# Altium PCB BOARD_4LAYER.PcbDoc (part 16 of 21)
Units mil, origin at the board's own origin, x right, y up, seen from the top; angles counter-clockwise.
Board outline 6692.91 x 10039.37 mil, 4 copper layers (Top Layer, Mid Layer 1, Mid Layer 2, Bottom Layer), stack 66.299 mil thick; 1532 components, 908 nets, 4105 pads, 1286 vias.
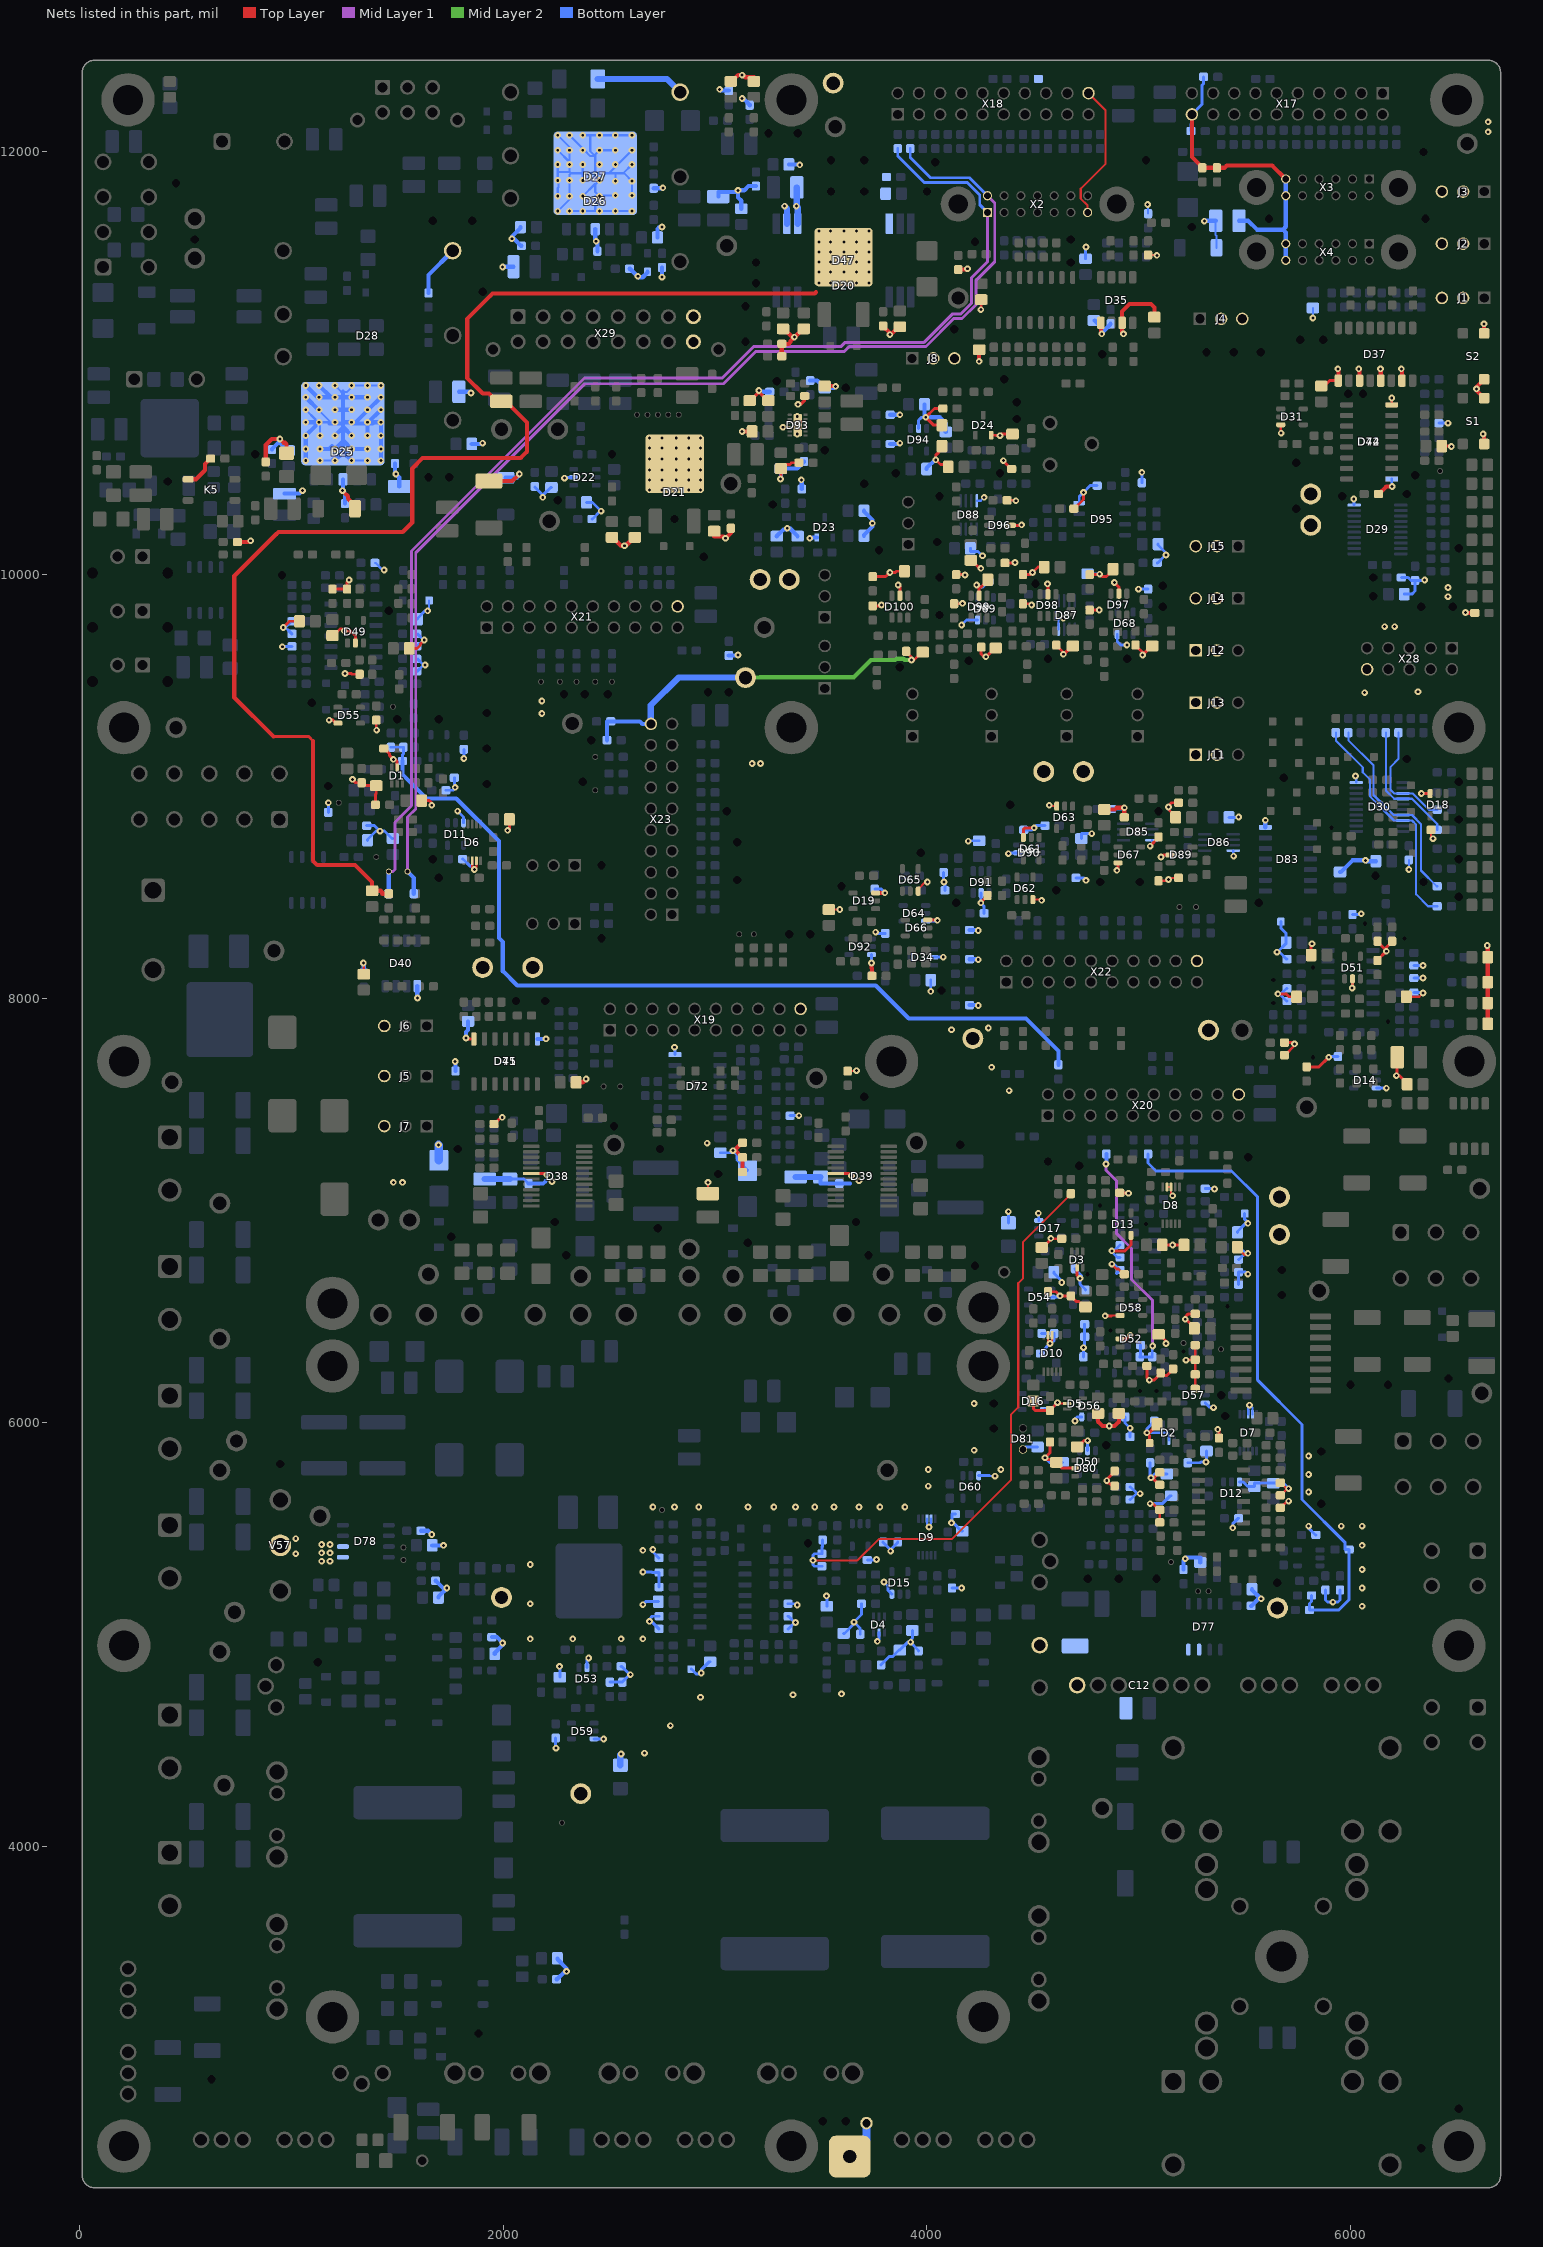
[diagram p18: the nets of this part, all layers, seen from the top]

## Via types
v1: diameter 27.56/31.5/31.5/27.56 (per signal layer), hole 13.78, Top Layer to Bottom Layer, 1270 vias
v2: diameter 59.06, hole 39.37, Top Layer to Bottom Layer, 16 vias

## Nets (pads, with @x,y where several pads share a name; then routed paths per layer and width w, separated by ;. In a path a pad name is that pad's centre, name@x,y a point inside that pad or via, vN(x,y) a via of type N, cw(c..) or ccw(c..) an arc to the next point about the centre after c; other vN are vias at no path point) (continued)
GND: C13.1 C14.1 C16.1 C17.1 C19.1 C20.1 C21.1 C22.1 C23.1 C24.1 C25.1 C26.1 C27.1 C28.1 C29.1 C30.1 C31.1 C32.1 C33.1 C34.1 C37.1 C39.1 C40.1 C41.1 C45.1 C46.1 C48.1 C49.1 C50.1 C51.1 C52.1 C53.1 C54.1 C55.1 C56.1 C57.1 C58.1 C59.1 C60.1 C61.1 C62.1 C63.1 C64.1 C65.1 C66.1 C67.1 C68.1 C69.1 C70.1 C71.1 C72.1 C73.1 C74.1 C75.1 C76.1 C77.1 C78.1 C79.1 C80.1 C81.1 C82.1 C95.1 C96.1 C97.1 C98.1 C100.1 C101.1 C102.1 C103.1 C104.1 C105.1 C106.1 C108.1 C109.1 C110.1 C111.1 C112.1 C113.1 C114.1 C115.1 C118.1 C120.1 C121.1 C122.1 C123.1 C124.1 C125.1 C126.1 C127.1 C128.1 C129.1 C130.1 C131.1 C132.1 C133.1 C134.1 C135.1 C136.1 C137.1 C138.1 C139.1 C140.1 C141.1 C142.1 C143.1 C144.1 C145.1 C146.1 C147.2 C148.2 C160.2 C162.2 C164.2 C166.2 C167.2 C168.2 C169.2 C170.2 C171.2 C172.2 C173.2 C174.2 C176.2 C177.2 C178.2 C179.2 C180.2 C181.2 C182.2 C183.2 C184.2 C185.2 C186.2 C187.2 C188.2 C189.2 C190.2 C191.2 C192.2 C193.2 C194.2 C195.2 C199.1 C201.1 C202.1 C203.1 C204.1 C205.1 C206.1 C207.1 C208.1 C209.1 C210.1 C211.1 C212.1 C213.1 C221.2 C230.2 C231.2 C245.2 C248.1 C257.1 C258.1 C259.1 C260.1 C261.1 C262.1 C264.1 C265.1 C266.1 C272.1 C273.1 C294.2 C295.2 C296.2 C297.2 C298.2 C299.2 C300.2 C309.2 C310.2 C311.1 C312.1 C313.1 C314.1 C315.1 C319.1 C320.1 C321.1 C322.1 C323.1 C326.1 D1.2 D2.2 D3.2 D4.2 D5.2 D6.3 D6.4 D7.3 D7.4 D8.3 D8.4 D9.3 D9.4 D10.3 D10.4 D11.3 D12.3 D13.3 D14.3 D15.3 D16.3 D17.3 D18.3 D19.3 D21.4 D22.2 D23.2 D25.3 D25.6 D26.3 D26.6 D27.5 D28.5 D29.10 D30.10 D31.3 D34.2 D35.5 D35.7 D37.9 D37.11 D37.13 D37.15 D38.6 D39.6 D40.5 D41.7 D42.8 D47.2 D47.3 D49.2 D50.2 D51.2 D52.2 D53.2 D54.2 D55.3 D56.3 D57.3 D58.3 D59.3 D60.3 D61.3 D62.3 D63.3 D64.3 D65.3 D66.3 D67.3 D72.7 D74.8 D75.7 D80.2 D81.3 D83.7 D85.4 D86.4 D89.2 D90.2 D91.2 D92.3 D93.4 D93.13 H18.2 H19.1 H20.2 H21.2 H22.2 H23.2 J1.2 J1.3 J2.2 J2.3 J3.2 J3.3 J4.2 J4.3 J5.3 J6.3 J7.3 J11.1 J11.2 J12.1 J12.2 J13.1 J13.2 J14.2 J14.3 J15.2 J15.3 R5.2 R7.2 R54.1 R57.2 R58.2 R59.2 R60.1 R61.1 R64.2 R65.2 R66.2 R67.1 R77.2 R78.1 R80.2 R81.2 R82.2 R84.2 R85.2 R86.2 R87.2 R88.2 R89.2 R90.1 R93.2 R94.2 R95.2 R96.1 R98.1 R106.1 R140.1 R141.1 R152.1 R153.1 R154.1 R267.1 R320.1 R321.1 R326.1 R333.1 R334.1 R339.1 R344.1 R346.1 R355.1 R356.1 R361.1 R368.1 R369.1 R374.1 R378.1 R390.1 R395.1 R402.1 R407.1 R520.1 R523.1 R530.1 R531.1 R533.1 R536.1 R537.1 R538.1 R539.1 R544.1 R561.1 R562.1 R568.1 R572.1 R573.1 R580.2 R581.2 R582.2 R586.1 R587.1 R588.1 R589.1 R605.2 R606.2 R655.1 R662.1 R663.1 R715.1 R716.1 R717.1 R718.1 R719.1 R720.1 R724.1 R725.2 R729.1 S1.3 S1.4 S2.3 S2.4 TP44.1 TP45.1 TP46.1 TP47.1 TP48.1 TP49.1 TP50.1 TP51.1 TP52.1 TP53.1 TP54.1 TP55.1 TP56.1 TP57.1 TP58.1 V7.1 V10.1 V14.1 V17.1 V21.1 V24.2 V31.1 V35.2 V39.2 V41.2 X19.20 X20.20 X21.20 X22.20 X28.10 X29.8 X29.16 | length 32382.7
  Top Layer w5.91: v1(3320.87,10696.85) D93.4@3352.36,10696.85
  Top Layer w10: D6.3@1854.33,8651.57 1854.33,8620.08 v1(1864.17,8610.24) 1874.02,8620.08 D6.4@1874.02,8651.57 ; v1@1990.16,7440.94 v1(1996.06,7440.94) ; v1(2690.94,10401.57) 2744.09,10454.72 v1(2750,10448.82) 2805.12,10503.94 D21.4@2809.06,10503.94 ; v1(2690.94,10448.82) v1(2690.94,10496.06) v1(2690.94,10547.24) 2715.63,10547.24 2725.32,10537.56 2725.32,10537.02 2736.74,10525.59 D21.4@2750,10525.59 ; v1(2690.94,10598.43) D21.4@2750,10539.37 ; v1(2690.94,10645.67) 2744.09,10592.52 v1(2750,10598.43) D21.4@2797.24,10598.43 ; v1(2750,10401.57) D21.4@2809.06,10401.57 ; v1(2750,10496.06) D21.4@2750,10525.59 ; v1(2750,10547.24) D21.4@2750,10539.37 ; v1(2750,10645.67) D21.4@2797.24,10598.43 ; v1(2875.98,10448.82) v1(2816.93,10448.82) ; v1(2875.98,10496.06) D21.4@2875.98,10543.31 ; v1(2875.98,10547.24) D21.4@2875.98,10543.31 ; v1(2875.98,10645.67) v1(2816.93,10645.67) 2816.93,10606.3 D21.4@2809.06,10598.43 ; v1(2931.1,10401.57) v1(2875.98,10401.57) v1(2816.93,10401.57) D21.4@2809.06,10401.57 ; v1(2931.1,10448.82) v1(2931.1,10496.06) v1(2931.1,10547.24) D21.4@2879.92,10547.24 ; v1(2931.1,10598.43) D21.4@2879.92,10547.24 ; v1(2931.1,10645.67) 2879.92,10594.49 v1(2875.98,10598.43) v1(2816.93,10598.43) D21.4@2809.06,10598.43 ; R544.1@2966.54,7080.71 v1(2966.54,7133.86) ; v1(3387.8,10665.35) D93.13@3387.8,10704.72 ; v1(3387.8,10748.03) v1(3387.8,10708.66) D93.13@3387.8,10704.72 ; D93.13@3389.76,10706.69 D93.13@3387.8,10704.72 ; C135.1@3537.4,8421.26 v1(3588.58,8421.26) ; C221.2@3625.98,7659.45 3665.35,7659.45 v1(3667.32,7661.42) ; D65.3@3958.66,8507.87 3958.66,8517.72 3992.13,8551.18 v1(4001.97,8551.18) ; v1(4253.94,8452.76) v1@4253.94,8454.72 ; D62.3@4500,8468.5 4537.4,8468.5 v1(4541.34,8464.57) ; D10.4@4570.87,6413.39 4570.87,6382.01 4578.86,6374.02 v1(4580.71,6374.02) 4582.56,6374.02 4590.55,6382.01 D10.3@4590.55,6413.39 ; v1(4576.77,8913.39) 4580.71,8909.45 D63.3@4612.2,8909.45 ; v1@4620.08,6090.55 D5.2@4661.42,6090.55 ; 4871.06,6503.94 4873.03,6505.91 D58.3@4911.42,6505.91 ; C61.1@4929.13,6700.79 C61.1@4931.1,6700.79 ; R718.1@5092.52,8557.09 5133.86,8557.09 v1(5139.76,8562.99) 5147.64,8570.87 R715.1@5187.01,8570.87 ; D8.4@5131.89,7112.2 D8.3@5151.57,7112.2 5151.57,7078.74 v1(5159.45,7070.87) ; D74.8@6192.91,10802.95 v1(6192.91,10834.65) ; 6322.83,8009.84 v1(6340.55,8027.56) ; C75.1@6377.95,8797.24 6377.95,8765.75 v1(6387.8,8755.91) ; D21.4@2750,10525.59 D21.4@2809.06,10525.59 ; D21.4@2750,10525.59 D21.4@2750,10539.37 ; D21.4@2797.24,10598.43 D21.4@2809.06,10598.43 ; D21.4@2809.06,10401.57 2809.06,10448.82 v1(2816.93,10448.82) ; D21.4@2809.06,10503.94 v1(2816.93,10496.06) v1(2816.93,10448.82) ; D21.4@2809.06,10503.94 D21.4@2809.06,10525.59 ; D21.4@2809.06,10525.59 2816.93,10533.46 v1(2816.93,10547.24) 2816.93,10571.93 2809.06,10579.8 D21.4@2809.06,10598.43 ; D21.4@2809.06,10525.59 2817.77,10525.59 2835.49,10543.31 D21.4@2875.98,10543.31 ; D21.4@2875.98,10543.31 D21.4@2879.92,10547.24
  Top Layer w13.78: v1(962.6,9751.97) 992.13,9781.5 C170.2@1039.37,9781.5 ; v1(1179.13,9314.96) 1182.57,9318.4 1193.41,9318.4 1210.63,9301.18 D55.3@1220.47,9301.18 ; C113.1@1194.88,9714.57 1198.82,9714.57 1229.81,9745.56 1240.66,9745.56 v1(1250,9736.22) 1278.62,9736.22 1303.15,9711.69 D49.2@1303.15,9679.13 ; C294.2@1194.88,9933.07 R520.1@1263.78,9933.07 1263.78,9966.54 v1(1273.62,9976.38) ; v1(1253.94,9535.43) 1283.46,9535.43 1287.4,9531.5 R326.1@1322.83,9531.5 ; v1(1289.37,9035.43) 1305.12,9019.68 R140.1@1332.68,9019.68 1346.46,9005.91 C100.1@1401.57,9005.91 1401.57,8969.41 1397.64,8965.47 C95.1@1397.64,8915.35 ; v1(1340.55,8169.29) 1342.52,8167.32 C167.2@1342.52,8116.14 ; C26.1@1401.57,9314.96 1401.57,9269.68 v1(1403.54,9267.72) ; R54.1@1437.01,9181.1 1438.98,9181.1 1464.83,9155.25 1464.83,9147.38 v1(1482.28,9129.92) 1491.22,9129.92 1500,9121.14 D1.2@1500,9090.55 ; C169.2@1557.09,9653.54 1594.28,9653.54 1610.5,9669.76 1610.5,9675.46 v1(1627.95,9692.91) ; C110.1@1616.14,8935.04 1652.64,8935.04 1663.39,8924.29 v1(1663.39,8913.39) ; v1(1824.8,7814.96) 1828.74,7811.02 D75.7@1861.81,7811.02 ; C21.1@1956.69,7409.45 1958.66,7409.45 v1@1990.16,7440.94 ; v1(2021.65,8795.28) 2029.53,8803.15 C109.1@2029.53,8846.46 ; D38.6@2132.87,7176.18 2199.8,7176.18 v1(2206.69,7169.29) ; C146.1@3163.39,10822.83 3167.32,10822.83 3206.69,10862.2 v1@3206.69,10864.17 ; v1(3206.69,10870.08) v1@3206.69,10864.17 ; C195.2@3251.97,10822.83 3248.03,10822.83 v1@3206.69,10864.17 ; v1(3309.06,10452.76) 3311.02,10454.72 C147.2@3311.02,10501.97 3311.02,10521.65 3353.35,10521.65 3361.22,10529.53 R725.2@3395.67,10529.53 ; v1(3391.73,10805.12) 3404.16,10805.12 3423.23,10824.19 R724.1@3423.23,10844.49 ; D39.6@3569.88,7176.18 3632.87,7176.18 v1(3643.7,7165.35) ; D66.3@4003.94,8372.05 4047.24,8372.05 v1(4049.21,8370.08) ; v1@4253.94,8454.72 4285.43,8486.22 C77.1@4285.43,8488.19 ; D61.3@4454.72,8761.81 4454.72,8797.92 4463.89,8807.09 v1(4505.91,8807.09) ; C138.1@4501.97,6102.36 4501.97,6065.87 4510.75,6057.09 R98.1@4580.71,6057.09 4580.71,6059.06 4612.2,6090.55 4620.08,6090.55 v1(4616.14,6094.49) ; C125.1@4541.34,6826.77 4545.28,6826.77 4584.65,6866.14 v1(4584.65,6870.08) 4586.61,6868.11 C97.1@4635.83,6868.11 ; R78.1@4570.87,6618.11 4608.27,6618.11 v1(4627.95,6598.43) R152.1@4679.13,6598.43 4679.13,6596.46 4704.22,6571.37 4718,6571.37 4744.09,6545.28 C102.1@4748.03,6545.28 ; R154.1@4580.71,5909.45 4580.71,5858.27 v1(4557.09,5834.65) 4565.92,5825.81 4610.24,5825.81 C264.1@4610.24,5812.99 4637.8,5785.43 D80.2@4698.82,5785.43 ; C265.1@4708.66,5885.83 4712.6,5885.83 4743.59,5916.82 4756.41,5916.82 v1(4757.87,5915.35) ; D3.2@4708.66,6732.28 4708.66,6694.88 v1(4722.44,6681.1) ; v1(4840.55,6503.94) 4871.06,6503.94 ; v1(4872.05,6748.03) 4894.2,6725.88 4904.04,6725.88 C61.1@4929.13,6700.79 ; v1(4872.05,6811.02) 4934.84,6811.02 4962.6,6838.79 D13.3@4962.6,6883.86 ; R378.1@4885.83,5700.79 4874.02,5700.79 4859.74,5715.07 ; C211.1@4885.83,5771.65 4885.83,5769.69 4848.43,5732.28 v1(4848.43,5726.38) ; v1(4895.67,8606.3) 4901.57,8612.2 D67.3@4901.57,8641.73 ; C54.1@4909.45,7084.65 4948.82,7084.65 v1(4950.79,7082.68) ; D52.2@4911.42,6395.67 4943.98,6395.67 4958.66,6410.35 v1(4958.66,6413.39) ; R361.1@5037.4,6267.72 5037.4,6212.6 v1(5049.21,6200.79) 5070.87,6200.79 R531.1@5102.36,6232.28 ; V10.1@5050.2,5903.54 5050.2,5939.96 v1(5037.4,5952.76) 5049.21,5952.76 5084.65,5988.19 C312.1@5084.65,5992.13 ; v1(5053.15,5618.11) 5066.93,5618.11 5096.46,5588.58 R395.1@5098.43,5588.58 C34.1@5098.43,5529.53 ; v1(5053.15,8720.47) 5053.15,8722.44 5092.52,8761.81 C212.1@5092.52,8763.78 ; v1(5057.09,5740.16) v1@5062.99,5740.16 ; C126.1@5092.52,6417.32 5096.46,6417.32 5127.95,6385.83 v1(5127.95,6374.02) ; C30.1@5098.43,5706.69 5096.46,5706.69 v1@5062.99,5740.16 ; R334.1@5098.43,5765.75 5096.46,5765.75 5070.87,5740.16 v1@5062.99,5740.16 ; R531.1@5102.36,6234.25 R531.1@5102.36,6232.28 ; v1(5104.33,8669.29) 5114.17,8679.13 D89.2@5149.21,8679.13 ; C187.2@5110.24,6838.58 v1(5159.45,6838.58) C124.1@5212.6,6838.58 ; C298.2@5161.42,6253.94 5161.42,6251.97 5132.95,6223.5 5102.36,6223.5 R531.1@5102.36,6232.28 ; C140.1@5173.23,8856.3 5173.23,8860.24 5139.76,8893.7 v1(5139.76,8905.51) 5139.76,8910.51 5154.45,8925.2 C76.1@5187.01,8925.2 ; v1(5222.44,6295.28) 5224.41,6297.24 C297.2@5265.75,6297.24 ; C188.2@5261.81,6444.88 5261.81,6448.82 5222.44,6488.19 v1(5218.5,6488.19) 5218.5,6499.09 5233.19,6513.78 C60.1@5265.75,6513.78 ; R87.2@5265.75,6159.45 R88.2@5265.75,6228.35 C297.2@5265.75,6297.24 ; R89.2@5265.75,6366.14 C297.2@5265.75,6297.24 ; v1(5372.05,5968.5) 5377.95,5962.6 R333.1@5377.95,5927.17 ; C186.2@5464.57,6828.74 5464.57,6824.8 5495.56,6793.81 5508.37,6793.81 v1(5513.78,6799.21) ; v1(5655.51,8023.62) 5694.42,8023.62 5708.2,8009.84 C184.2@5744.09,8009.84 ; R64.2@5667.32,5598.43 5669.29,5598.43 5700.79,5629.92 v1(5706.69,5629.92) ; C29.1@5667.32,5657.48 5669.29,5657.48 v1@5700.79,5688.98 ; R65.2@5667.32,5716.54 5669.29,5716.54 5696.85,5688.98 v1@5700.79,5688.98 ; D31.3@5669.29,10708.66 5669.29,10671.26 v1(5671.26,10669.29) ; R77.2@5687.01,7734.25 5688.98,7734.25 5734.25,7779.53 v1(5734.25,7787.4) 5734.25,7795.28 5732.28,7793.31 C245.2@5687.01,7793.31 ; v1(5706.69,5688.98) v1@5700.79,5688.98 ; C230.2@5791.34,7679.13 5850.39,7679.13 v1(5895.67,7724.41) ; C127.1@5812.99,8206.69 5812.99,8255.91 v1(5816.93,8259.84) ; C105.1@5860.24,10891.73 5874.98,10891.73 5900.57,10917.32 D37.9@5941.14,10917.32 ; v1(6005.91,8051.18) 6007.87,8053.15 D51.2@6007.87,8094.49 ; R662.1@6125.98,8181.1 6125.98,8183.07 v1(6167.32,8224.41) v1@6167.32,8228.35 ; R530.1@6125.98,8271.65 6125.98,8269.68 v1@6167.32,8228.35 ; C296.2@6194.88,8271.65 6194.88,8269.68 6167.32,8242.13 v1@6167.32,8228.35 ; R655.1@6218.5,7724.41 6218.5,7641.73 v1(6214.57,7637.8) 6228.35,7637.8 6265.75,7600.39 C185.2@6265.75,7596.46 ; C183.2@6261.81,8009.84 6322.83,8009.84 ; v1(6332.68,8968.5) D18.3@6374.02,8968.5 ; C104.1@6429.13,10608.27 6472.44,10608.27 v1(6474.41,10606.3) ; v1(4848.43,5726.38) 4859.74,5715.07 ; v1(4848.43,5726.38) 4848.43,5716.54 4849.89,5715.07 4859.74,5715.07
  Top Layer w19.68: C74.1@746.06,10155.51 803.15,10155.51 v1(809.06,10161.42) ; C52.1@879.92,10533.46 879.92,10613.14 908.51,10641.73 v1(946.85,10641.73) 964.31,10624.28 971.27,10624.28 978.35,10617.2 R568.1@978.35,10574.8 ; v1(1242.13,10397.64) 1259.58,10380.18 1259.83,10380.18 1268.22,10371.8 1268.22,10359.74 1301.18,10326.77 V41.2@1301.18,10312.99 ; R729.1@1933.07,10442.91 2043.31,10442.91 v1(2076.77,10476.38) ; C108.1@2344.49,7606.3 2375.98,7606.3 v1(2391.73,7622.05) ; C123.1@2513.78,10177.17 2517.72,10177.17 2557.09,10137.8 v1(2572.83,10137.8) 2578.74,10137.8 2618.11,10177.17 C181.2@2622.05,10177.17 ; C122.1@2996.06,10206.69 2996.06,10181.1 3041.34,10181.1 v1(3049.21,10173.23) 3050.18,10173.23 3074.8,10197.85 C51.1@3074.8,10220.47 ; v1(3084.65,7283.46) v1@3090.55,7283.46 ; v1(3127.95,10677.17) C326.1@3175.2,10677.17 ; R580.2@3129.92,7183.07 R582.2@3129.92,7251.97 3127.95,7251.97 3096.46,7283.46 v1@3090.55,7283.46 ; R581.2@3129.92,7320.87 3127.95,7320.87 v1@3090.55,7283.46 ; H22.2@3183.07,12328.74 3183.07,12348.47 3142.64,12348.47 3132.84,12358.27 v1(3127.95,12358.27) 3126.48,12359.74 3109.74,12359.74 H18.2@3094.75,12344.75 ; C144.1@3517.72,10891.73 3566.93,10891.73 v1(3568.9,10889.76) ; v1(3738.19,8169.29) 3738.19,8144.61 3740.16,8142.64 C79.1@3740.16,8108.27 ; D19.3@3757.87,8500 v1(3801.18,8500) ; v1(4246.06,11007.87) C160.2@4246.06,11062.99 ; C266.1@4807.09,6043.31 4807.09,6004.92 4827.76,5984.25 v1(4860.24,5984.25) 4884.74,5984.25 4886.81,5986.33 4886.92,5986.33 4905.51,6004.92 C137.1@4905.51,6043.31 ; D35.5@4820.67,11189.76 4820.67,11141.93 v1(4824.8,11137.8) ; C192.2@4836.61,8893.7 4887.8,8893.7 4895.67,8901.57 v1(4931.1,8901.57) C82.1@4931.1,8856.3 ; v1(4927.17,11137.8) 4920.67,11144.29 D35.7@4920.67,11189.76 4920.67,11242.49 4956.26,11278.08 5056.93,11278.08 5072.83,11262.17 C106.1@5072.83,11216.54 ; v1(5938.98,10972.44) 5941.14,10970.28 D37.9@5941.14,10917.32 ; v1(6037.4,10972.44) 6041.14,10968.7 D37.11@6041.14,10917.32 ; C14.1@6129.92,10381.89 6131.89,10381.89 6167.32,10417.32 v1(6194.88,10417.32) ; v1(6139.76,10972.44) 6141.14,10971.06 D37.13@6141.14,10917.32 ; v1(6238.19,10972.44) 6241.14,10969.49 D37.15@6241.14,10917.32 ; v1(6541.34,9822.83) 6543.31,9820.87 C199.1@6584.65,9820.87 ; v1(6624.02,10665.35) 6628.74,10660.63 S1.3@6628.74,10618.11 ; v1(6627.95,11185.04) 6628.74,11184.25 S2.4@6628.74,11139.76 ; S1.4@6628.74,10834.65 6592.52,10870.87 v1(6592.52,10877.95) 6592.52,10887.01 S2.3@6628.74,10923.23 ; v1(6643.7,8251.97) 6645.67,8250 H23.2@6645.67,8196.85 H21.2@6645.67,8078.74 H19.1@6645.67,7980.31 H20.2@6645.67,7881.89 ; H18.2@3094.75,12344.75 3090.81,12344.75 H18.2@3074.8,12328.74 3078.74,12328.74 H18.2@3094.75,12344.75
  Bottom Layer w10: v1@972.44,9751.97 C24.1@984.97,9739.44 ; v1(1068.9,10779.53) 1114.57,10733.86 D25.6@1114.57,10714.17 ; D25.6@1131.89,10775.59 1181.5,10725.98 1181.5,10714.17 1175.2,10720.47 v1(1131.89,10720.47) 1131.89,10718.11 1135.83,10714.17 v1(1135.83,10657.48) ; v1(1135.83,10539.37) 1186.48,10539.37 1196.59,10549.47 v1(1206.69,10539.37) ; v1(1206.69,10893.7) 1236.22,10864.17 1244.09,10864.17 1263.78,10864.17 D25.6@1293.31,10893.7 ; v1(1285.43,10539.37) v1(1360.24,10539.37) ; v1(1285.43,10893.7) D25.6@1293.31,10893.7 ; R320.1@1395.67,10057.09 1397.64,10057.09 1431.1,10023.62 v1(1438.98,10023.62) ; v1(1423.23,10893.7) v1(1360.24,10893.7) D25.6@1293.31,10893.7 ; v1@1624.02,9574.8 v1(1631.89,9574.8) ; v1@1624.02,9692.91 v1(1627.95,9692.91) ; v1@1631.89,9830.71 v1(1643.7,9830.71) 1650.59,9837.6 V7.1@1650.59,9879.92 ; C39.1@2149.61,10415.35 C39.1@2149.61,10417.32 ; v1@2248.03,4466.54 v1(2250,4464.57) ; v1(2257.87,11716.54) 2320.87,11779.53 v1(2312.99,11787.4) v1(2312.99,11862.2) 2312.99,11888.98 D26.6@2319.29,11895.28 ; v1(2257.87,11787.4) 2257.87,11826.77 2261.81,11830.71 2261.81,11858.27 v1(2257.87,11862.2) D26.6@2257.87,11901.57 ; v1(2257.87,11937.01) D26.6@2257.87,11901.57 ; v1(2257.87,12003.94) D26.6@2312.99,11948.82 ; v1(2257.87,12074.8) 2320.87,12011.81 v1(2312.99,12003.94) D26.6@2312.99,11948.82 ; v1(2312.99,11716.54) v1(2375.98,11716.54) D26.6@2435.04,11716.54 ; v1(2312.99,12074.8) D26.6@2383.86,12003.94 ; v1(2375.98,11787.4) 2433.33,11844.75 D26.6@2435.04,11844.75 ; v1(2375.98,11862.2) D26.6@2375.98,11895.28 ; v1(2375.98,11937.01) D26.6@2375.98,11895.28 ; v1(2375.98,12003.94) D26.6@2383.86,12003.94 ; v1(2375.98,12074.8) D26.6@2411.42,12074.8 ; v1(2454.72,11937.01) D26.6@2435.04,11937.01 ; v1(2529.53,11791.34) 2454.72,11791.34 v1(2454.72,11787.4) ; v1(2529.53,11858.27) D26.6@2529.53,11895.28 ; v1(2529.53,11937.01) D26.6@2529.53,11925.2 ; v1(2529.53,12003.94) v1(2454.72,12003.94) 2435.04,11984.25 D26.6@2435.04,11976.38 ; v1(2608.27,11716.54) v1(2529.53,11716.54) v1(2454.72,11716.54) D26.6@2435.04,11716.54 ; v1(2608.27,11791.34) v1(2608.27,11858.27) 2571.26,11895.28 D26.6@2566.54,11895.28 ; v1(2608.27,11937.01) D26.6@2566.54,11895.28 ; v1(2608.27,12003.94) D26.6@2529.53,11925.2 ; v1(2608.27,12074.8) v1(2529.53,12074.8) v1(2454.72,12074.8) D26.6@2411.42,12074.8 ; V39.2@3153.54,7188.98 V39.2@3153.54,7192.91 ; D9.3@4000,5547.24 4000,5515.87 v1@4005.81,5510.06 ; v1(4009.84,5507.87) 4007.99,5507.87 v1@4005.81,5510.06 ; D9.4@4019.68,5547.24 4019.68,5523.94 v1@4005.81,5510.06 ; 4294.21,5750 4296.18,5748.03 v1(4320.87,5748.03) ; C164.2@4787.4,11200.79 C164.2@4791.34,11200.79 ; v1(5037.4,5952.76) 5134.92,5952.76 5141.73,5945.94 D2.2@5141.73,5915.35 ; v1(5053.15,8720.47) 5061.02,8728.35 D85.4@5061.02,8749.02 ; D86.4@5444.88,8699.8 5444.88,8675.2 v1(5446.85,8673.23) ; D7.3@5515.75,6039.37 5515.75,6076.77 v1(5521.65,6082.68) 5523.5,6082.68 5535.43,6070.75 D7.4@5535.43,6039.37 ; v1(6021.65,9051.18) 6025.59,9047.24 D30.10@6025.59,9020.67 ; v1(6273.62,8610.24) R106.1@6273.62,8655.51 ; D26.6@2257.87,11901.57 D26.6@2312.99,11901.57 ; D26.6@2312.99,11901.57 D26.6@2319.29,11895.28 ; D26.6@2312.99,11901.57 v1(2312.99,11937.01) D26.6@2312.99,11948.82 ; D26.6@2319.29,11895.28 D26.6@2375.98,11895.28 ; D26.6@2375.98,11895.28 D26.6@2435.04,11895.28 ; D26.6@2383.86,12003.94 2411.42,11976.38 D26.6@2435.04,11976.38 ; D26.6@2411.42,12074.8 2411.42,12000 D26.6@2435.04,11976.38 ; D26.6@2435.04,11716.54 2435.04,11787.4 v1(2454.72,11787.4) ; D26.6@2435.04,11844.75 2435.04,11807.09 v1(2454.72,11787.4) ; D26.6@2435.04,11844.75 2437.27,11844.75 v1(2454.72,11862.2) 2435.04,11881.89 D26.6@2435.04,11895.28 ; D26.6@2435.04,11895.28 D26.6@2499.61,11895.28 ; D26.6@2435.04,11895.28 D26.6@2435.04,11937.01 ; D26.6@2435.04,11937.01 D26.6@2435.04,11976.38 ; D26.6@2499.61,11895.28 D26.6@2529.53,11925.2 ; D26.6@2499.61,11895.28 D26.6@2529.53,11895.28 ; D26.6@2529.53,11895.28 D26.6@2566.54,11895.28
  Bottom Layer w13.78: v1(958.66,9661.42) 960.63,9663.39 R57.2@1003.94,9663.39 ; v1(962.6,9751.97) 972.44,9751.97 1001.97,9781.5 R58.2@1003.94,9781.5 ; R60.1@1175.2,8879.92 v1(1175.2,8925.2) ; C27.1@1356.3,8816.93 1393.7,8816.93 v1(1419.29,8791.34) ; C171.2@1360.24,8748.03 1360.24,8751.97 1399.61,8791.34 v1(1419.29,8791.34) ; C321.1@1480.32,8755.91 1476.38,8755.91 1440.94,8791.34 v1(1419.29,8791.34) ; C33.1@1592.52,9545.28 1594.49,9545.28 1624.02,9574.8 1594.49,9604.33 R390.1@1592.52,9604.33 ; C25.1@1592.52,9663.39 1594.49,9663.39 1624.02,9692.91 1594.49,9722.44 R321.1@1592.52,9722.44 ; C311.1@1596.46,9791.34 1596.46,9795.28 v1@1631.89,9830.71 ; R59.2@1730.32,8984.25 1762.87,8984.25 1773.62,8995 v1(1773.62,8998.03) 1769.68,9001.97 C202.1@1769.68,9043.31 ; v1(1785.43,8885.83) 1812.99,8858.27 D11.3@1812.99,8830.71 ; C23.1@1809.06,8659.45 1811.02,8659.45 1842.78,8627.69 1846.72,8627.69 v1(1864.17,8610.24) ; v1(1814.96,9133.86) C203.1@1814.96,9177.17 ; C320.1@2031.5,7149.61 2098.43,7149.61 C20.1@2120.08,7127.95 ; C39.1@2149.61,10415.35 2187.01,10377.95 v1@2187.01,10375.98 ; v1(2187.01,10366.14) v1@2187.01,10375.98 ; C176.2@2228.35,10413.39 2224.41,10413.39 v1@2187.01,10375.98 ; v1@2248.03,4466.54 C66.1@2248.03,4511.81 ; v1(2265.75,4850.39) 2267.72,4848.43 C130.1@2267.72,4799.21 ; v1(2289.37,10456.69) 2293.31,10460.63 D22.2@2332.68,10460.63 ; C177.2@2393.7,10342.52 2421.26,10342.52 v1(2462.6,10301.18) 2458.66,10301.18 2421.26,10263.78 C40.1@2419.29,10263.78 ; D53.2@2395.67,4844.49 2395.67,4881.89 v1(2403.54,4889.76) ; D59.3@2429.13,4507.87 v1(2474.41,4507.87) ; R533.1@2503.94,4775.59 C299.2@2562.99,4775.59 2562.99,4777.56 2596.46,4811.02 v1@2598.43,4811.02 ; R374.1@2557.09,4850.39 2559.06,4850.39 v1@2598.43,4811.02 ; v1(2600.39,4811.02) v1@2598.43,4811.02 ; v1(2659.45,5141.73) 2673.23,5155.51 C189.2@2732.28,5155.51 ; v1(2659.45,5295.28) 2701.69,5295.28 2703.66,5293.31 C69.1@2736.22,5293.31 C65.1@2736.22,5224.41 ; v1(2706.69,5401.57) 2706.69,5389.76 2734.25,5362.2 R407.1@2736.22,5362.2 ; R368.1@2736.22,5027.56 2734.25,5027.56 2698.82,5062.99 v1(2690.94,5062.99) 2690.94,5073.9 2703.66,5086.61 R369.1@2736.22,5086.61 ; v1(2809.06,7771.65) 2811.02,7769.69 D72.7@2811.02,7736.61 ; V21.1@2887.8,4837.6 2888.78,4837.6 2913.05,4813.32 2929.47,4813.32 v1(2935.04,4818.9) 2935.04,4834.65 2972.44,4872.05 C315.1@2976.38,4872.05 ; C166.2@3025.59,7273.62 3074.8,7273.62 v1(3084.65,7283.46) 3102.86,7265.25 3102.86,7243.59 V39.2@3153.54,7192.91 ; R94.2@3344.49,5027.56 3346.46,5027.56 v1@3375.98,5057.09 ; C64.1@3344.49,5086.61 3346.46,5086.61 v1@3375.98,5057.09 ; R93.2@3344.49,5145.67 3381.89,5145.67 v1(3387.8,5139.76) ; C22.1@3354.33,7448.82 v1(3395.67,7448.82) ; v1(3379.92,5057.09) v1@3375.98,5057.09 ; v1(3525.59,5183.07) 3527.56,5181.1 C190.2@3527.56,5133.86 ; C103.1@3606.3,5005.91 3610.24,5005.91 3655.51,5051.18 v1(3655.51,5059.06) ; R153.1@3685.04,5001.97 3685.04,5028.51 3679.02,5034.53 3679.02,5035.55 v1(3655.51,5059.06) ; C98.1@3690.94,5145.67 3690.94,5094.49 v1(3655.51,5059.06) ; C209.1@3718.5,5352.36 3759.84,5352.36 v1(3761.81,5354.33) ; v1(3738.19,8169.29) D92.3@3738.19,8208.66 ; C213.1@3753.94,8517.72 3784.53,8517.72 3801.18,8501.06 v1(3801.18,8500) ; v1(3757.87,8314.96) 3763.78,8309.06 R586.1@3803.15,8309.06 ; v1(3765.75,4968.5) 3773.62,4976.38 D4.2@3773.62,5009.84 ; R90.1@3783.46,4856.3 3783.46,4858.27 3821.37,4896.17 3837.11,4896.17 3868.11,4927.17 C133.1@3872.05,4927.17 3909.45,4964.57 v1@3917.02,4964.57 ; R95.2@3793.31,5437.01 3793.31,5435.04 v1@3828.74,5399.61 ; v1(3797.24,5248.03) 3816.09,5229.18 3816.09,5209.5 D15.3@3834.65,5190.94 ; v1(3828.74,5393.7) v1@3828.74,5399.61 ; C208.1@3862.2,5437.01 3862.2,5435.04 3828.74,5401.57 v1@3828.74,5399.61 ; C129.1@3931.1,5019.69 3931.1,4983.19 3917.02,4969.1 v1@3917.02,4964.57 ; C68.1@3960.63,4923.23 3960.63,4925.2 3923.23,4962.6 v1(3923.23,4964.57) v1@3917.02,4964.57 ; D64.3@3994.09,8366.14 4045.28,8366.14 v1(4049.21,8370.08) ; v1(4017.72,8035.43) C193.2@4017.72,8088.58 ; D34.2@4033.46,8196.85 v1(4076.77,8196.85) ; C80.1@4078.74,8596.46 4078.74,8553.15 v1(4080.71,8551.18) 4084.65,8547.24 R717.1@4084.65,8511.81 ; C63.1@4118.11,5220.47 v1(4163.39,5220.47) ; C210.1@4133.86,5568.9 4117.57,5568.9 4117.57,5538.31 4116.14,5536.88 v1(4116.14,5527.56) 4124.02,5527.56 4163.39,5488.19 C128.1@4167.32,5488.19 ; v1(4194.88,8744.09) 4196.85,8746.06 C142.1@4246.06,8746.06 ; D60.3@4244.09,5750 4294.21,5750 ; D91.2@4255.91,8499.61 4255.91,8454.72 v1(4253.94,8452.76) 4269.69,8437.01 R720.1@4269.69,8403.54 ; R605.2@4383.86,6942.91 v1(4383.86,6996.06) ; v1(4383.86,8685.04) 4387.8,8688.98 D90.2@4430.71,8688.98 ; D81.3@4452.76,5873.23 4465.35,5885.83 C139.1@4521.65,5885.83 ; R719.1@4456.69,8797.24 4496.06,8797.24 v1(4505.91,8807.09) 4515.75,8816.93 R716.1@4557.09,8816.93 ; v1(4525.59,6988.19) 4527.56,6986.22 D17.3@4527.56,6954.72 ; C72.1@4535.43,6326.77 4563.25,6354.59 4563.25,6356.56 v1(4580.71,6374.02) 4585.71,6374.02 4600.39,6388.7 R536.1@4600.39,6421.26 C300.2@4541.34,6421.26 ; D16.3@4555.12,6062.99 4584.65,6062.99 v1(4616.14,6094.49) ; v1(4557.09,5834.65) 4578.74,5812.99 C114.1@4639.76,5812.99 ; D54.2@4584.65,6592.52 4622.05,6592.52 v1(4627.95,6598.43) ; C136.1@4598.43,6710.63 4598.43,6706.69 4635.83,6669.29 v1(4635.83,6661.42) ; v1(4698.82,6007.87) 4698.82,6018.78 4707.6,6027.56 D56.3@4730.31,6027.56 ; C73.1@4698.82,6726.38 4698.82,6724.41 4730.31,6692.91 4730.31,6681.1 v1(4722.44,6681.1) 4722.44,6653.54 4748.03,6627.95 R663.1@4748.03,6625.98 ; C78.1@4702.76,8570.87 4738.19,8570.87 v1(4750,8559.06) ; C141.1@4728.35,8755.91 4728.35,8779.53 v1(4777.56,8779.53) ; C206.1@4738.19,6311.02 v1(4738.19,6354.33) 4744.09,6360.24 C207.1@4744.09,6405.51 R86.2@4744.09,6464.57 ; D50.2@4757.87,5868.11 v1(4757.87,5915.35) ; C81.1@4870.08,8895.67 4925.2,8895.67 v1(4931.1,8901.57) ; v1(4872.05,6748.03) 4881.89,6748.03 R84.2@4909.45,6720.47 ; v1(4872.05,6811.02) v1@4877.95,6811.02 ; C58.1@4911.42,6779.53 4899.01,6779.53 4877.95,6800.58 v1@4877.95,6811.02 ; R85.2@4911.42,6838.58 4886.33,6813.49 4884.36,6813.49 4881.89,6811.02 v1@4877.95,6811.02 ; C31.1@4935.04,6027.56 4935.04,5998.03 v1(4958.66,5974.41) R339.1@4958.66,5933.07 ; R523.1@4958.66,5637.8 4960.63,5637.8 4988.19,5665.35 v1@4992.13,5665.35 ; C295.2@4958.66,5696.85 4960.63,5696.85 v1@4992.13,5665.35 ; v1(5005.91,5665.35) v1@4992.13,5665.35 ; v1(5037.4,5952.76) 5037.4,5970.47 5072.83,6005.91 C96.1@5072.83,6007.87 ; v1(5053.15,5618.11) 5110.24,5618.11 5147.64,5655.51 C172.2@5151.57,5655.51 ; R141.1@5053.15,5811.02 5053.15,5744.09 v1(5057.09,5740.16) 5074.8,5757.87 C101.1@5131.89,5757.87 ; R61.1@5230.31,5811.02 5288.31,5811.02 5292.24,5814.96 v1(5316.93,5814.96) 5318.9,5816.93 C112.1@5318.9,5866.14 ; D57.3@5312.99,6092.52 5331.54,6073.97 5348.04,6073.97 5351.14,6070.87 v1(5352.36,6070.87) ; R355.1@5312.99,7104.33 5354.33,7104.33 v1(5356.3,7102.36) ; C143.1@5425.2,8856.3 5468.5,8856.3 v1(5470.47,8858.27) ; v1(5442.91,5503.94) 5442.91,5523.62 5468.5,5549.21 C28.1@5470.47,5549.21 ; C314.1@5464.57,6897.64 5464.57,6901.57 5503.94,6940.94 v1(5513.78,6940.94) 5513.78,6944.88 5499.02,6959.64 V17.1@5499.02,6986.22 ; C62.1@5470.47,6651.57 R402.1@5470.47,6710.63 5503.94,6710.63 v1(5513.78,6700.79) ; C59.1@5470.47,6769.69 5472.44,6769.69 v1@5501.97,6799.21 ; R356.1@5470.47,6828.74 5472.44,6828.74 v1@5501.97,6799.21 ; D12.3@5474.41,5720.47 5492.13,5720.47 5513.78,5698.82 C111.1@5545.28,5698.82 5545.28,5714.57 C173.2@5633.86,5714.57 5681.1,5714.57 v1(5706.69,5688.98) ; v1(5513.78,6799.21) v1@5501.97,6799.21 ; v1(5651.57,8220.47) v1@5653.54,8220.47 ; v1(5655.51,8023.62) v1@5663.39,8023.62 ; V14.1@5670.28,8364.17 5670.28,8332.68 5694.88,8308.07 C313.1@5694.88,8265.75 5694.88,8261.81 v1@5653.54,8220.47 ; R80.2@5698.82,7990.16 5696.85,7990.16 v1@5663.39,8023.62 ; C55.1@5698.82,8049.21 5696.85,8049.21 5671.26,8023.62 v1@5663.39,8023.62 ; R346.1@5698.82,8187.01 5696.85,8187.01 5663.39,8220.47 v1@5653.54,8220.47 ; v1(5801.18,5511.81) 5801.18,5501.97 5832.68,5470.47 C205.1@5834.65,5470.47 ; R66.2@5879.92,5210.63 5879.92,5163.29 5889.66,5153.54 v1(5915.35,5153.54) 5939.08,5153.54 5948.82,5163.29 C204.1@5948.82,5210.63 ; v1(5895.67,7724.41) 5899.61,7728.35 C57.1@5938.98,7728.35 ; R344.1@6007.87,8397.64 6045.28,8397.64 v1(6049.21,8401.57) ; v1(6013.78,10358.27) 6015.75,10356.3 D29.10@6015.75,10329.72 ; D14.3@6120.08,7578.74 v1(6167.32,7578.74) ; D42.8@6192.91,10452.95 6192.91,10419.29 v1(6194.88,10417.32) ; C13.1@6238.19,9988.19 6270.67,9988.19 6284.45,9974.41 R5.2@6303.15,9974.41 ; C162.2@6251.97,9909.45 6287.77,9909.45 6303.15,9924.83 R5.2@6303.15,9974.41 ; R82.2@6297.24,8029.53 6338.58,8029.53 v1(6340.55,8027.56) ; C56.1@6297.24,8098.43 v1(6340.55,8098.43) ; R81.2@6297.24,8157.48 v1(6340.55,8157.48) ; v1(6348.43,9976.38) 6346.46,9974.41 R5.2@6303.15,9974.41 ; R7.2@6415.35,10716.54 v1(6458.66,10716.54) ; R84.2@4909.45,6720.47 R84.2@4911.42,6720.47 4895.53,6704.58 4893.56,6704.58 R84.2@4909.45,6720.47 ; C24.1@984.97,9739.44 986.94,9739.44 C24.1@1003.94,9722.44 1001.97,9722.44 C24.1@984.97,9739.44
  Bottom Layer w19.68: C272.1@909.45,10592.52 909.45,10594.49 v1@946.85,10631.89 ; v1(946.85,10641.73) v1@946.85,10631.89 ; C310.2@968.5,10383.86 1039.37,10383.86 v1(1053.15,10397.64) ; R572.1@988.19,10586.61 984.25,10586.61 946.85,10624.02 v1@946.85,10631.89 ; v1(1068.9,10539.37) v1(1068.9,10594.49) v1(1068.9,10657.48) 1114.57,10703.15 D25.6@1114.57,10714.17 ; v1(1068.9,10720.47) 1108.27,10720.47 D25.6@1114.57,10714.17 ; v1(1068.9,10838.58) 1131.89,10775.59 v1(1131.89,10779.53) ; v1(1068.9,10893.7) 1127.95,10834.65 v1(1131.89,10838.58) D25.6@1187.01,10838.58 ; v1(1131.89,10720.47) 1120.87,10720.47 D25.6@1114.57,10714.17 ; v1(1131.89,10893.7) D25.6@1187.01,10838.58 ; v1(1135.83,10594.49) 1178.61,10594.49 1192.65,10608.53 v1(1206.69,10594.49) D25.6@1244.09,10631.89 ; D25.6@1181.5,10714.17 D25.6@1206.69,10714.17 ; v1(1206.69,10539.37) D25.6@1244.09,10576.77 ; v1(1206.69,10657.48) D25.6@1244.09,10694.88 ; v1(1206.69,10720.47) D25.6@1206.69,10714.17 ; v1(1206.69,10779.53) D25.6@1244.09,10779.53 ; D25.3@1244.09,10450.79 1244.09,10399.61 v1(1242.13,10397.64) 1253.94,10385.83 C53.1@1253.94,10336.61 ; D25.6@1244.09,10864.17 D25.6@1244.09,10838.58 ; v1(1285.43,10539.37) 1248.03,10576.77 D25.6@1244.09,10576.77 ; v1(1285.43,10657.48) 1248.03,10694.88 D25.6@1244.09,10694.88 ; v1(1285.43,10779.53) D25.6@1244.09,10779.53 ; v1(1340.55,8169.29) 1342.52,8167.32 C201.1@1342.52,8122.05 ; v1(1360.24,10594.49) v1(1285.43,10594.49) 1248.03,10631.89 D25.6@1244.09,10631.89 ; v1(1360.24,10657.48) D25.6@1360.24,10714.17 ; v1(1360.24,10720.47) D25.6@1360.24,10716.54 ; v1(1360.24,10779.53) D25.6@1360.24,10775.59 ; v1(1360.24,10838.58) v1(1285.43,10838.58) D25.6@1244.09,10838.58 ; v1(1423.23,10539.37) v1(1423.23,10594.49) v1(1423.23,10657.48) v1(1423.23,10720.47) 1391.22,10720.47 1384.92,10714.17 D25.6@1360.24,10714.17 ; v1(1423.23,10779.53) D25.6@1360.24,10716.54 ; v1(1423.23,10838.58) D25.6@1360.24,10775.59 ; C46.1@1490.16,10525.59 1490.16,10480.32 v1(1494.09,10476.38) 1509.84,10460.63 C262.1@1509.84,10417.32 ; D40.5@1594.68,8059.84 1594.68,8005.71 v1(1596.46,8003.94) ; R96.1@1612.2,5490.16 1645.67,5490.16 v1(1663.39,5472.44) ; R562.1@1647.64,11330.71 1647.64,11415.35 D28.5@1762.2,11529.92 ; C323.1@1665.35,5421.26 v1(1718.5,5421.26) ; C67.1@1681.1,5253.94 1683.07,5253.94 1716.54,5220.47 v1(1734.25,5220.47) 1734.25,5218.5 1694.88,5179.13 C191.2@1694.88,5175.2 ; v1(1773.62,7704.72) 1775.59,7702.76 C17.1@1775.59,7659.45 ; C261.1@1791.34,10864.17 1842.52,10864.17 v1(1848.43,10858.27) ; v1(1824.8,7814.96) 1824.8,7843.5 1834.65,7853.35 C168.2@1834.65,7893.7 ; C121.1@1852.36,10618.11 1899.61,10618.11 v1(1903.54,10622.05) ; C71.1@1946.85,4988.19 1970.47,4988.19 v1(1998.03,4960.63) 1998.03,4950.79 1960.63,4913.39 C131.1@1960.63,4909.45 ; v1(1998.03,11452.76) 2000,11454.72 C309.2@2049.21,11454.72 ; V31.1@2011.81,10458.66 2064.06,10458.66 2076.77,10471.38 v1(2076.77,10476.38) ; R573.1@2082.68,11641.73 2082.68,11637.8 2041.34,11596.46 v1(2041.34,11586.61) 2051.18,11586.61 2084.65,11553.15 C273.1@2086.61,11553.15 ; C20.1@2120.08,7127.95 2188.93,7127.95 2200.03,7139.06 ; D41.7@2161.81,7811.02 v1(2202.76,7811.02) ; C70.1@2251.97,3374.02 2253.94,3374.02 2291.34,3411.42 v1(2299.21,3411.42) 2299.21,3425.2 2255.91,3468.5 C132.1@2255.91,3472.44 ; D26.3@2435.04,11631.89 2435.04,11578.74 v1(2438.98,11574.8) 2444.88,11568.9 C49.1@2444.88,11527.56 ; C48.1@2596.46,11444.88 2598.43,11444.88 2633.86,11409.45 v1(2635.83,11409.45) 2640.42,11404.86 2658.8,11404.86 2681.1,11427.17 V24.2@2681.1,11431.1 ; R561.1@2710.63,11824.8 2751.97,11824.8 v1(2753.94,11826.77) ; C182.2@2728.35,11592.52 2728.35,11632.95 2737.13,11641.73 v1(2750,11641.73) ; v1(2750,11405.51) C50.1@2750,11450.79 ; C260.1@3015.75,11785.43 3015.75,11807.11 3104.33,11807.11 v1@3108.27,11811.05 ; v1(3021.65,12291.34) 3027.56,12285.43 C41.1@3064.96,12285.43 ; C231.2@3064.96,9620.08 3106.3,9620.08 v1(3108.27,9622.05) ; C115.1@3124.02,11728.35 3124.02,11765.75 3108.27,11781.5 v1@3108.27,11811.05 ; v1(3127.95,12248.03) 3133.86,12248.03 3163.39,12218.5 R267.1@3163.39,12216.54 ; C37.1@3192.91,11834.65 3157.48,11834.65 3137.8,11814.96 v1(3108.27,11814.96) v1@3108.27,11811.05 ; v1(3206.69,10870.08) 3212.6,10864.17 R537.1@3257.87,10864.17 ; C179.2@3291.34,10183.07 3322.33,10214.07 3334.15,10214.07 v1(3340.55,10220.47) 3352.36,10220.47 C178.2@3389.76,10183.07 ; v1(3309.06,10452.76) 3311.02,10454.72 C148.2@3311.02,10501.97 3387.8,10501.97 3419.29,10533.46 R539.1@3419.29,10535.43 ; C118.1@3348.43,11937.01 3397.64,11937.01 v1(3399.61,11935.04) ; v1(3407.48,10448.82) 3409.45,10446.85 C45.1@3409.45,10405.51 ; v1(3446.85,10173.23) 3454.65,10173.23 3458.58,10177.17 D23.2@3480.32,10177.17 ; R538.1@3448.82,10917.32 3482.28,10917.32 C145.1@3517.72,10881.89 3561.02,10881.89 v1(3568.9,10889.76) ; C319.1@3498.03,7159.45 3498.03,7127.95 C19.1@3586.61,7127.95 3636.4,7127.95 ; C180.2@3702.76,10185.04 3702.76,10188.98 3742.13,10228.35 v1(3742.13,10244.09) 3742.13,10259.84 3702.76,10299.21 C120.1@3702.76,10303.15 ; R587.1@4200.79,7970.47 4240.16,7970.47 v1(4242.13,7968.5) ; R588.1@4200.79,8187.01 4240.16,8187.01 v1(4242.13,8185.04) ; R589.1@4200.79,8324.8 4240.16,8324.8 v1(4242.13,8322.83) ; C164.2@4791.34,11200.79 4824.8,11167.32 v1@4824.8,11141.73 ; v1(4824.8,11137.8) v1@4824.8,11141.73 ; C16.1@4866.14,11185.04 4866.14,11183.07 v1@4824.8,11141.73 ; R67.1@5210.63,5307.09 5210.63,5350.39 v1(5218.5,5358.27) 5223.81,5363.58 5289.37,5363.58 C322.1@5289.37,5340.55 ; C32.1@5529.53,5135.83 5531.5,5135.83 5564.96,5169.29 v1@5574.8,5169.29 ; C174.2@5533.46,5214.57 5533.46,5210.63 v1@5574.8,5169.29 ; v1(5576.77,5169.29) v1@5574.8,5169.29 ; D83.7@5596.46,8809.45 v1(5596.46,8842.52) ; C134.1@5948.82,8598.43 5952.76,8598.43 6007.87,8653.54 v1(6068.9,8653.54) 6072.83,8649.61 C194.2@6118.11,8649.61 ; D25.6@1187.01,10838.58 v1(1206.69,10838.58) D25.6@1244.09,10838.58 ; D25.6@1206.69,10714.17 D25.6@1244.09,10714.17 ; D25.6@1244.09,10576.77 D25.6@1244.09,10631.89 ; D25.6@1244.09,10631.89 D25.6@1244.09,10694.88 ; D25.6@1244.09,10694.88 D25.6@1244.09,10714.17 ; D25.6@1244.09,10714.17 1250.39,10720.47 v1(1285.43,10720.47) 1291.73,10714.17 D25.6@1298.82,10714.17 ; D25.6@1244.09,10714.17 D25.6@1244.09,10779.53 ; D25.6@1244.09,10779.53 D25.6@1244.09,10838.58 ; D25.6@1298.82,10714.17 D25.6@1360.24,10775.59 ; D25.6@1298.82,10714.17 D25.6@1357.87,10714.17 ; D25.6@1357.87,10714.17 D25.6@1360.24,10714.17 ; D25.6@1357.87,10714.17 D25.6@1360.24,10716.54
  Bottom Layer w29.53: C258.1@1913.39,7149.61 C320.1@2031.5,7149.61 ; C248.1@2446.85,12340.55 2772.44,12340.55 D27.5@2835.04,12277.95 ; R606.2@2553.15,4383.86 2553.15,4433.07 v1(2557.09,4437.01) ; v1(3328.74,11740.16) 3339.37,11729.53 D47.2@3339.37,11657.48 ; C257.1@3379.92,7159.45 C319.1@3498.03,7159.45 ; C259.1@3385.83,11828.74 3385.83,11744.09 3383.86,11742.13 v1(3383.86,11740.16) 3389.76,11734.25 D47.3@3389.76,11657.48
  Bottom Layer w39.37: v1(1694.88,7311.02) 1696.85,7309.06 V35.2@1696.85,7238.19
  other v1: 2667.32,4440.94 2789.37,4570.87 2931.1,4704.72 3368.11,4716.54 3596.46,4720.47 2127.95,4980.31 2328.74,4980.31 2557.09,4980.31 2659.45,4980.31 6053.15,5133.86 2127.95,5145.67 6053.15,5220.47 6053.15,5307.09 2127.95,5330.71 2659.45,5397.64 6053.15,5421.26 5954.72,5511.81 6053.15,5511.81 2706.69,5602.36 2809.06,5602.36 2923.23,5602.36 3155.51,5602.36 3277.56,5602.36 3379.92,5602.36 3470.47,5602.36 3561.02,5602.36 3679.13,5602.36 3777.56,5602.36 3895.67,5602.36 5801.18,5673.23 4005.91,5700.79 5801.18,5755.91 4005.91,5779.53 4348.43,5779.53 5801.18,5842.52 4222.44,5870.08 4222.44,6090.55 1482.28,7133.86 1525.59,7133.86 2230.32,7137.8 3679.13,7141.73 2962.6,7318.9 4387.8,7566.93 4305.12,7677.17 4116.14,7854.33 4289.37,7862.2 3175.2,9110.24 3214.57,9110.24 2183.07,9346.46 2183.07,9405.51 6064.96,9444.88 6316.93,9448.82 6159.45,9755.91 6206.69,9755.91 6458.66,9897.64 6458.66,9940.94
GND_PS: C42.1 C43.1 C219.2 R32.1 R546.1 X3.6 X3.12 X4.6 X4.12 X17.20 | length 1596.9
  Top Layer w19.68: X17.20@5250,12173.23 5250,11972.44 5299.21,11923.23 C43.1@5299.21,11921.26 C42.1@5368.11,11921.26 5403.9,11921.26 5414.88,11932.23 5628.79,11932.23 X3.6@5692.91,11868.11
  Bottom Layer w13.78: R32.1@5246.06,12094.49 5246.06,12126.97 5250,12130.91 X17.20@5250,12173.23 5298.64,12221.86 5298.64,12311.43 5305.12,12317.91 C219.2@5305.12,12350.39
  Bottom Layer w19.68: R546.1@5472.44,11671.26 5514.84,11671.26 5556.92,11629.18 5678.99,11629.18 ; X4.12@5692.91,11484.25 X4.6@5692.91,11562.99 5692.91,11615.26 5678.99,11629.18 ; X3.6@5692.91,11868.11 X3.12@5692.91,11789.37 5692.91,11643.1 5678.99,11629.18
GND_UM: C15.1 C18.1 C35.1 C36.1 C38.1 C44.1 C83.1 C84.1 C85.1 C86.1 C87.1 C88.1 C89.1 C90.1 C91.1 C92.1 C93.1 C94.1 C107.1 C116.1 C117.1 C119.1 C149.1 C150.1 C151.1 C152.1 C153.1 C154.1 C155.1 C156.1 C157.1 C158.1 C159.1 C161.2 C163.2 C165.2 C175.2 C196.2 C197.2 C198.2 C200.1 C220.2 C246.2 C268.1 C269.1 C270.1 C271.1 C327.1 D20.4 D24.2 D47.12 D68.3 D69.3 D87.4 D88.4 D94.2 D95.4 D96.2 D97.2 D98.2 D99.2 D100.2 J8.2 J8.3 R125.2 R268.1 R383.1 R384.1 R546.2 R554.2 R714.1 R733.1 R735.1 R737.1 R738.1 R739.1 R742.1 R744.1 R747.1 R750.1 TP6.1 TP7.1 V30.2 X2.7 X18.20 X23.20 | length 14733.2
  Top Layer w10: v1(3490.16,11377.95) 3543.31,11431.1 v1(3545.28,11429.13) 3592.52,11476.38 D20.4@3606.3,11476.38 ; v1(3490.16,11429.13) v1(3490.16,11476.38) D20.4@3490.16,11519.68 ; v1(3490.16,11523.62) D20.4@3490.16,11519.68 ; v1(3490.16,11570.87) D20.4@3545.28,11515.75 ; v1(3490.16,11622.05) 3543.31,11568.9 v1(3545.28,11570.87) D20.4@3596.46,11570.87 ; v1(3545.28,11377.95) D20.4@3606.3,11377.95 ; v1(3545.28,11476.38) D20.4@3545.28,11515.75 ; v1(3545.28,11523.62) D20.4@3545.28,11515.75 ; v1(3545.28,11622.05) D20.4@3596.46,11570.87 ; v1(3608.27,11476.38) D20.4@3606.3,11476.38 ; v1(3608.27,11570.87) D20.4@3606.3,11570.87 ; v1(3608.27,11622.05) D20.4@3612.2,11622.05 ; v1(3667.32,11429.13) v1(3608.27,11429.13) ; v1(3667.32,11476.38) D20.4@3667.32,11511.81 ; v1(3667.32,11523.62) D20.4@3667.32,11511.81 ; v1(3667.32,11570.87) D20.4@3612.2,11570.87 ; v1(3726.38,11377.95) v1(3667.32,11377.95) v1(3608.27,11377.95) D20.4@3606.3,11377.95 ; v1(3726.38,11429.13) v1(3726.38,11476.38) v1(3726.38,11523.62) D20.4@3679.13,11523.62 ; v1(3726.38,11570.87) D20.4@3679.13,11523.62 ; v1(3726.38,11622.05) v1(3667.32,11622.05) D20.4@3612.2,11622.05 ; v1(4253.94,11251.97) 4255.91,11253.94 C161.2@4255.91,11299.21 ; R735.1@4377.95,10352.36 4417.32,10352.36 v1(4419.29,10350.39) ; X2.7@4757.87,11710.63 4757.87,11743.32 4725.31,11775.88 4725.31,11822.42 4841.61,11938.72 4841.61,12193.82 X18.20@4762.2,12273.23 ; C15.1@5043.31,11509.84 5082.68,11509.84 v1(5084.65,11507.87) ; D20.4@3490.16,11519.68 3494.09,11515.75 D20.4@3545.28,11515.75 ; D20.4@3545.28,11515.75 3561.02,11500 D20.4@3606.3,11500 ; D20.4@3596.46,11570.87 D20.4@3606.3,11570.87 ; D20.4@3606.3,11377.95 3608.27,11379.92 v1(3608.27,11429.13) ; D20.4@3606.3,11476.38 D20.4@3606.3,11500 ; D20.4@3606.3,11476.38 3608.27,11474.41 v1(3608.27,11429.13) ; D20.4@3606.3,11500 3655.51,11500 D20.4@3667.32,11511.81 ; D20.4@3606.3,11500 3608.27,11501.97 v1(3608.27,11523.62) 3606.3,11525.59 D20.4@3606.3,11564.96 ; D20.4@3606.3,11564.96 D20.4@3606.3,11570.87 ; D20.4@3606.3,11564.96 D20.4@3612.2,11570.87 ; D20.4@3612.2,11570.87 D20.4@3612.2,11622.05 ; D20.4@3667.32,11511.81 D20.4@3679.13,11523.62
  Top Layer w13.78: 916.06,9237.42 1083.35,9237.42 1103.49,9217.29 ; R739.1@3744.09,9854.33 3781.5,9854.33 v1(3785.43,9858.27) ; R750.1@3744.09,9992.13 3805.12,9992.13 v1(3824.8,10011.81) 3850.39,10011.81 3856.3,10017.72 C271.1@3893.7,10017.72 ; v1(3864.17,9952.76) 3872.05,9944.88 D100.2@3872.05,9901.97 ; C92.1@3901.57,9639.76 3901.57,9637.8 3927.17,9612.2 v1(3927.17,9598.43) 3938.98,9598.43 3976.38,9635.83 C157.1@3980.32,9635.83 ; C198.2@4070.87,10608.27 4070.87,10594.48 4041.34,10564.95 v1(4041.34,10543.31) 4063.9,10520.75 4100.39,10520.75 C196.2@4100.39,10509.84 ; C151.1@4070.87,10706.69 4031.5,10706.69 v1(3994.09,10744.09) 4035.43,10785.43 C85.1@4074.8,10785.43 ; R738.1@4127.95,9864.17 4165.35,9864.17 v1(4167.32,9866.14) ; R747.1@4137.8,10001.97 4177.17,10001.97 v1(4179.13,10000) ; C153.1@4206.69,10068.9 4210.63,10068.9 4248.03,10031.5 v1(4253.94,10031.5) ; v1(4234.25,9952.76) v1@4243.59,9943.41 ; D99.2@4246.06,9901.97 4246.06,9940.94 v1@4243.59,9943.41 ; C91.1@4255.91,9659.45 4255.91,9626.89 4268.62,9614.17 v1(4277.56,9614.17) 4279.53,9614.17 4320.87,9655.51 C156.1@4324.8,9655.51 ; C270.1@4287.4,9978.35 4287.4,9974.41 4256.41,9943.41 v1@4243.59,9943.41 ; D24.2@4303.15,10659.45 4324.88,10659.45 4326.85,10657.48 v1(4344.49,10657.48) 4352.36,10665.35 C197.2@4403.54,10665.35 ; v1(4360.24,10539.37) 4360.24,10537.4 4397.64,10500 R383.1@4399.61,10500 ; C88.1@4368.11,10057.09 4413.39,10057.09 v1(4415.35,10059.06) ; D96.2@4396.06,10234.25 4444.88,10234.25 v1(4446.85,10236.22) ; R737.1@4452.76,9864.17 4488.19,9864.17 v1(4494.09,9858.27) ; R744.1@4452.76,10001.97 4488.19,10001.97 v1(4498.03,10011.81) 4523.62,10037.4 C269.1@4553.15,10037.4 ; v1(4568.9,9957.87) 4570.87,9955.91 D98.2@4570.87,9909.06 ; C90.1@4610.24,9669.29 4610.24,9667.32 4643.7,9633.86 v1(4643.7,9625.98) 4645.67,9625.98 4685.04,9665.35 C155.1@4688.98,9665.35 ; R733.1@4692.91,10312.99 4694.88,10312.99 4738.19,10356.3 v1(4738.19,10389.76) ; R714.1@4767.72,9834.65 v1(4812.99,9834.65) ; R742.1@4767.72,10001.97 4812.99,10001.97 v1(4814.96,10003.94) 4826.27,9992.63 4846.96,9992.63 4877.95,10023.62 C268.1@4877.95,10027.56 ; v1(4883.86,9964.57) 4901.31,9947.11 4901.31,9946.73 4905.51,9942.53 D97.2@4905.51,9911.81 ; C89.1@4984.25,9669.29 4984.25,9667.32 5017.72,9633.86 v1@5017.72,9624.02 ; v1(5017.72,9622.05) v1@5017.72,9624.02 ; C154.1@5062.99,9665.35 5059.06,9665.35 v1@5017.72,9624.02
  Top Layer w19.68: 916.06,9237.42 731.59,9421.89 731.59,9994.4 907.96,10170.77 929.24,10192.05 940.09,10202.9 1526.47,10202.9 1571.17,10247.61 1571.17,10503.11 1619.57,10551.5 2082.99,10551.5 2113.16,10581.68 2113.16,10719.51 2013.78,10818.9 R554.2@1992.13,10818.9 1970.47,10818.9 1933.57,10855.8 1904.02,10855.8 1830.54,10929.28 1830.54,11207.71 1943.07,11320.24 1950.49,11327.66 3470.46,11327.66 3477.07,11334.28 ; 1103.49,9217.29 1103.49,8651.33 1122.77,8632.05 1301.6,8632.05 1381.89,8551.75 C165.2@1381.89,8509.84 1422.32,8509.84 1430.04,8502.13 1430.04,8496.06 C18.1@1460.63,8496.06 ; R268.1@3314.96,11031.5 C35.1@3314.96,11090.55 3347.52,11090.55 3356.56,11099.59 3356.56,11104.59 v1(3374.02,11122.05) ; C117.1@3320.87,11161.42 3324.8,11161.42 3364.17,11122.05 v1(3374.02,11122.05) ; C175.2@3419.29,11161.42 3415.35,11161.42 3375.98,11122.05 v1(3374.02,11122.05) ; C38.1@3793.31,11175.2 3793.31,11173.23 3824.8,11141.73 v1(3824.8,11133.86) 3830.71,11133.86 3868.11,11171.26 C116.1@3872.05,11171.26 ; C44.1@4147.64,11440.94 4187.01,11440.94 v1(4190.94,11444.88)
  Mid Layer 2 w19.68: TP7.1@3143.7,9515.75 3210.23,9515.75 3211.55,9517.07 3653.97,9517.07 3735.32,9598.43 3849.61,9598.43 3855.67,9604.49 3888.42,9604.49 3894.48,9598.43 v1(3927.17,9598.43)
  Bottom Layer w10: D88.4@4235.24,10350.39 4253.94,10350.39 v1(4269.69,10366.14) ; D87.4@4621.06,9744.09 4621.06,9786.5 4629.84,9795.28 v1(4643.7,9795.28) ; v1(5041.34,11748.03) 5043.31,11746.06 C200.1@5043.31,11704.72 ; R546.2@5362.2,11671.26 5362.2,11603.35 5366.14,11599.41 V30.2@5366.14,11543.31 ; v1(5820.87,11212.6) C107.1@5820.87,11259.84
  Bottom Layer w13.78: D94.2@3960.63,10690.94 3960.63,10729.75 3974.98,10744.09 v1(3994.09,10744.09) ; v1(4163.39,9763.78) 4187.01,9787.4 D69.3@4238.19,9787.4 ; C158.1@4204.72,10125.98 4204.72,10111.14 4241.22,10111.14 v1(4261.81,10090.55) ; v1(4234.25,9952.76) 4243.59,9943.41 4264.28,9943.41 4289.37,9968.5 C93.1@4291.34,9968.5 ; D95.4@4718.5,10339.37 4718.5,10370.08 v1(4738.19,10389.76) 4769.69,10421.26 C86.1@4803.15,10421.26 ; C163.2@4748.03,11492.13 4748.03,11545.28 v1(4750,11547.24) ; C159.1@4757.87,10005.91 4812.99,10005.91 v1(4814.96,10003.94) ; D68.3@4897.64,9718.5 4897.64,9686.12 4914.47,9669.29 v1(4942.91,9669.29) ; v1(4998.03,9933.07) C94.1@5043.31,9933.07 ; R384.1@5013.78,10435.04 v1(5013.78,10484.25) ; C87.1@5086.61,10057.09 5088.58,10057.09 5125.98,10094.49 v1(5127.95,10094.49) 5127.95,10104.33 5090.55,10141.73 C152.1@5090.55,10145.67
  Bottom Layer w19.68: R125.2@2490.16,9220.47 2490.16,9309.06 C246.2@2507.87,9309.06 2645,9309.06 2656.81,9297.24 X23.20@2697.24,9297.24 ; C83.1@3826.77,10618.11 3868.11,10618.11 v1(3872.05,10622.05) ; C84.1@3826.77,10755.91 v1(3872.05,10755.91) ; C149.1@3988.19,10805.12 3988.19,10750 v1(3994.09,10744.09) 4059.95,10744.09 4088.58,10715.46 C327.1@4088.58,10675.2 ; C150.1@3998.03,10500 3998.03,10503.94 4037.4,10543.31 v1(4041.34,10543.31) ; v1(5309.06,11669.29) 5311.02,11671.26 R546.2@5362.2,11671.26
  Bottom Layer w29.53: X23.20@2697.24,9297.24 2697.24,9385.23 2827.76,9515.75 TP7.1@3143.7,9515.75
  other v1: 6647.64,12090.55 6647.64,12137.8
GND_VENT: K5.3 R69.1 | length 164.2
  Top Layer w19.68: K5.3@513.78,10451.57 550.28,10451.57 593.02,10494.32 593.02,10524.12 618.11,10549.21 R69.1@620.08,10549.21
Graund: KW3.1 X8.1 | length 190.1
  Bottom Layer w39.37: X8.1@3635.83,2537.4 3714.57,2616.14 KW3.1@3714.57,2694.88
I_AMP: C7.2 C12.2 D77.3 D77.4 R637.2 V56.2
I_MOST: D78.1 D78.2 V57.2
  other v1: 1143.7,5346.46 1183.07,5346.46 1021.65,5381.89 1143.7,5385.83 1183.07,5385.83 1143.7,5425.2 1183.07,5425.2 1021.65,5452.76
I_MOST_OSC: C228.2 R392.1 R465.1 R477.1 | length 2995.8
  Bottom Layer w13.78: R477.1@5043.31,7267.72 5043.31,7224.75 5080.25,7187.8 5437.14,7187.8 5560.32,7064.62 5560.32,6200.66 5769.87,5991.11 5769.87,5637.5 5973.31,5434.06 5973.31,5401.57 R465.1@5992.13,5401.57 5992.13,5165.45 5942.82,5116.14 C228.2@5805.12,5116.14 5805.12,5146.73 5814.96,5156.57 R392.1@5814.96,5185.04
I_UM_P: C224.2 R387.1 R464.1 R474.1 | length 4239
  Bottom Layer w13.78: C224.2@1470.47,9187.01 R387.1@1529.53,9187.01 1529.53,9154.45 1527.4,9154.45 1525.59,9152.64 R464.1@1525.59,9122.05
  Bottom Layer w19.68: R464.1@1525.59,9122.05 1525.59,9058.86 1639.07,8945.39 1779.06,8945.39 1980.32,8744.13 1980.32,8286.86 1998.67,8268.5 1998.67,8130.44 2066.83,8062.29 3758.32,8062.29 3914.11,7906.5 4467.9,7906.5 4620.08,7754.32 R474.1@4620.08,7688.98
I_UM_S: C239.2 R399.1 R470.1 R492.1 | length 1165.5
  Mid Layer 1 w13.78: v1(4844.49,7220.47) 4844.49,7191.2 4893.28,7142.41 4893.28,6893.96 4965.19,6822.05 4965.19,6676.33 5064.96,6576.57 v1(5064.96,6362.2)
  Bottom Layer w13.78: R492.1@5007.87,6366.14 5007.87,6314.96 R399.1@5003.94,6311.02 C239.2@5062.99,6311.02 5062.99,6360.24 v1(5064.96,6362.2)
  Bottom Layer w19.68: v1(4844.49,7220.47) 4846.46,7222.44 R470.1@4846.46,7267.72
I_UM_Z: C243.2 R404.1 R469.1 R493.1 | length 2760.6
  Top Layer w10: v1(3462.6,5350.39) 3672.47,5350.39 3772.86,5450.79 4117.55,5450.79 4396.97,5730.2 4396.97,6039.3 4430.69,6073.02 4430.69,6073.81 4430.7,6657.94 4453.94,6681.17 4453.94,6853.54 4679.13,7078.74 R469.1@4679.13,7080.71
  Bottom Layer w13.78: C243.2@3503.94,5322.83 3469.5,5322.83 3462.6,5329.74 v1(3462.6,5350.39) 3462.6,5374.99 3469.5,5381.89 R404.1@3503.94,5381.89 3503.94,5412.48 3505.75,5414.29 3507.87,5414.29 R493.1@3507.87,5446.85
IN_EN_UM: OSC6.1 R450.1 R622.1 X2.8 | length 5811.5
  Mid Layer 1 w13.78: OSC6.1@1549.21,8600.39 1549.21,8857.44 1587.68,8895.91 1587.68,10104.51 2385.32,10902.14 3039.42,10902.14 3192.63,11055.36 3610.77,11055.36 3633.47,11078.06 3994.84,11078.06 4126.45,11209.67 4165.75,11209.67 4230.36,11274.28 4230.36,11388.18 4319.88,11477.7 4319.88,11754.92 X2.8@4285.43,11789.37
  Bottom Layer w13.78: R450.1@3921.26,12011.81 3921.26,11969.3 4016.15,11874.42 4200.39,11874.42 X2.8@4285.43,11789.37
  Bottom Layer w19.68: OSC6.1@1549.21,8600.39 1578.74,8570.87 R622.1@1578.74,8496.06
IN_F_UM: OSC7.1 R449.1 R621.1 X2.1 | length 5854.2
  Mid Layer 1 w13.78: OSC7.1@1460.63,8600.39 1479.58,8600.39 1489.33,8610.14 1489.33,8832.82 1568,8911.49 1568,10112.66 2384.1,10928.76 3034.3,10928.76 3184.37,11078.83 3595.56,11078.83 3614.48,11097.75 3986.69,11097.75 4119.33,11230.39 4158.64,11230.39 4210.16,11281.92 4210.16,11402.43 4285.43,11477.7 X2.1@4285.43,11710.63
  Bottom Layer w13.78: R449.1@3862.2,12011.81 3862.2,11976.56 3987.8,11850.97 4191.22,11850.97 4249.09,11793.1 4249.09,11746.97 X2.1@4285.43,11710.63
  Bottom Layer w19.68: R621.1@1460.63,8496.06 OSC7.1@1460.63,8600.39
IND_BLOCING: D30.13 R160.1 R170.2 | length 544.2
  Bottom Layer w10: R170.2@6224.41,9255.91 6224.41,9131.42 6187.76,9094.77 6187.76,8985.39 6203.66,8969.49 D30.13@6246.06,8969.49 6291.26,8969.49 6369.02,8891.73 R160.1@6407.48,8891.73
IND_BLOCING_AMP: D30.17 R155.1 R163.1 | length 950
  Bottom Layer w10: R163.1@5988.19,9255.91 5988.19,9220.17 6106.86,9101.5 6106.86,8962.14 6201.87,8867.13 D30.17@6246.06,8867.13 6288.46,8867.13 6331.3,8824.29 6331.3,8605.71 6405.51,8531.5 R155.1@6407.48,8531.5
IND_BLOCING_IP: D30.14 R156.1 R164.2 | length 608.3
  Bottom Layer w10: R164.2@6165.35,9255.91 6165.35,8982.72 6204.18,8943.9 D30.14@6246.06,8943.9 6288.46,8943.9 6407.48,8824.88 R156.1@6407.48,8797.24
IND_BLOCING_IS: D30.18 R157.1 R165.1 | length 1092.3
  Bottom Layer w10: R165.1@5929.13,9255.91 5929.13,9219.17 6056.02,9092.28 6056.02,9068.52 6090.96,9033.58 6090.96,8955.55 6093.57,8952.93 6093.57,8951.62 6203.66,8841.54 D30.18@6246.06,8841.54 6288.46,8841.54 6307.83,8822.17 6307.83,8493.01 6363.83,8437.01 R157.1@6407.48,8437.01